# Altium PCB Secondary-Board-v1.0.PcbDoc (part 2 of 3)
Units mm, origin at the board's own origin, x right, y up, seen from the top; angles counter-clockwise.
Board outline 160 x 120 mm, 4 copper layers (Top Layer, GND, PWR, Bottom Layer), stack 1.566 mm thick; 110 components, 60 nets, 340 pads, 181 vias.
Unrouted connection lines stored in the file: 32.
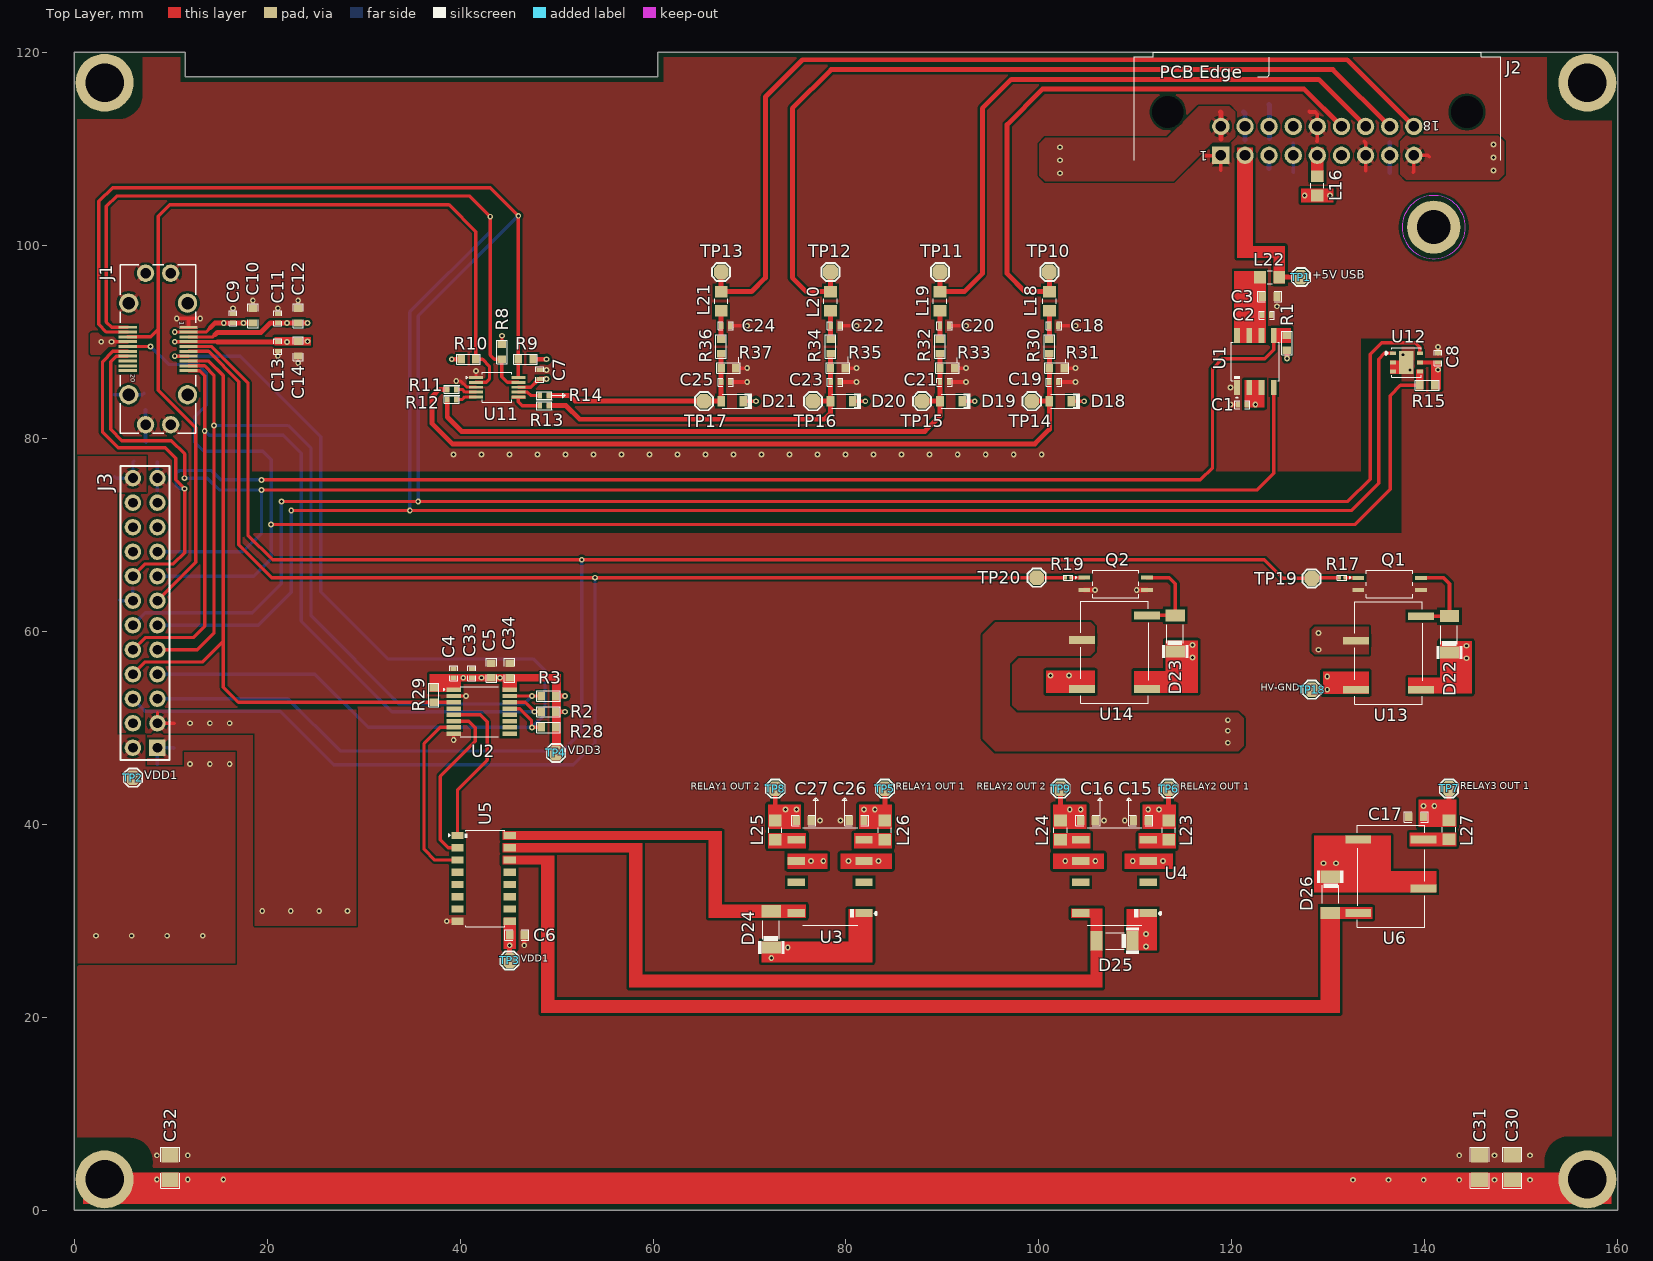
[diagram p0: Top Layer view]

## Via types
v1: diameter 0.6, hole 0.3, Top Layer to Bottom Layer, 181 vias

## Nets (pads, with @x,y where several pads share a name; then routed paths per layer and width w, separated by ;. In a path a pad name is that pad's centre, name@x,y a point inside that pad or via, vN(x,y) a via of type N, cw(c..) or ccw(c..) an arc to the next point about the centre after c; other vN are vias at no path point) (continued)
GND: (continued)
  Top Layer w0.305: C9.1@16.472,92.871 v1(16.472,93.455) ; C10.1@18.529,93.455 v1(18.529,94.268) ; v1(21.12,88.502) C13.1@21.12,89.027 ; C11.1@21.12,92.871 v1(21.12,93.455) ; v1(23.228,87.791) C14.1@23.228,88.502 ; C12.1@23.228,93.455 v1(23.228,94.268) ; v1(39.34,48.717) U2.8@39.34,49.363 ; U2.2@39.34,53.263 v1(40.615,53.263) ; v1(39.611,85.918) 39.614,85.915 40.07,85.915 40.715,85.27 41.638,85.27 U11.3@41.64,85.268 ; U11.1@41.64,86.268 v1(41.64,86.944) ; C7.2@48.26,87.058 v1(48.971,87.058)
  Top Layer w0.381: v1(10.643,92.401) 11.862,92.401 ; J1.1@11.862,91.485 11.862,92.401 ; v1(13.081,92.401) 11.862,92.401 ; C25.1@67.998,85.801 v1(69.759,85.801) ; C24.1@67.998,91.643 v1(69.759,91.643) ; R37.1@68.583,87.249 v1(69.759,87.249) ; C23.1@79.338,85.801 v1(81.098,85.801) ; C22.1@79.338,91.643 v1(81.098,91.643) ; R35.1@79.922,87.249 v1(81.098,87.249) ; C21.1@90.678,85.801 v1(92.438,85.801) ; C20.1@90.678,91.643 v1(92.438,91.643) ; R33.1@91.262,87.249 v1(92.438,87.249) ; C19.1@102.018,85.801 v1(103.778,85.801) ; C18.1@102.018,91.643 v1(103.778,91.643) ; R31.1@102.602,87.249 v1(103.778,87.249) ; 117.246,109.271 118.819,109.271 J2.1@118.848,109.3 118.848,107.774 118.847,107.772 118.847,107.747 ; v1(119.837,83.47) C1.1@120.593,83.47 ; 128.016,113.843 128.067,113.792 128.625,113.792 128.848,113.569 J2.14@128.848,112.3 128.848,110.789 128.803,110.744 ; 133.696,110.749 133.848,110.597 J2.7@133.848,109.3 133.848,107.737
  Top Layer w0.508: v1(38.626,29.921) U5.8@39.743,29.921 ; v1(46.66,27.427) C6.2@46.66,28.499 ; Q2.2@104.701,64.262 v1(105.791,64.262) ; v1(110.121,64.262) Q2.3@111.201,64.262 ; C8.2@141.351,88.773 v1(141.351,89.433)
  Bottom Layer w0.381: 7.412,82.916 J1.SH4@7.412,81.385 7.412,79.644 7.479,79.577 ; 8.636,46.228 J3.1@8.636,47.904 10.287,47.904 10.312,47.879 ; 8.636,74.574 J3.23@8.636,75.844 8.636,77.495
  other v1: 8.578,5.664 11.786,5.664 143.551,5.664 147.198,5.664 150.881,5.664 77.292,40.369 79.426,40.369 106.751,40.369 108.885,40.369 39.319,78.308 42.222,78.308 45.125,78.308 48.028,78.308 50.931,78.308 53.833,78.308 56.736,78.308 59.639,78.308 62.542,78.308 65.445,78.308 68.348,78.308 71.251,78.308 74.153,78.308 77.056,78.308 79.959,78.308 82.862,78.308 85.765,78.308 88.668,78.308 91.571,78.308 94.473,78.308 97.376,78.308 100.279,78.308 119.837,85.233 138.441,87.034 137.707,88.632 124.67,93.65
HV-GND: L16.1 TP18.1 U13.4 U14.4 | length 4.6
  Top Layer w0.33: TP18.1@128.27,53.924 U13.4@132.85,53.924
  other v1: 129.869,53.924 129.869,55.296 101.194,55.397 103.124,55.397 127.533,105.137 130.163,105.137
I2C2_SCL: J1.10 J3.10 R2.1 U2.14 | length 96.4
  Top Layer w0.345: J3.10@6.096,58.064 7.357,59.325 12.347,59.325 13.538,60.516 v1(13.538,80.747) 13.538,86.473 13.027,86.985 J1.10@11.862,86.985 ; U2.14@45.14,52.613 46.752,52.613 v1(47.727,51.638) R2.1@48.412,51.638
  Bottom Layer w0.345: v1(13.538,80.747) 13.998,80.287 21.681,80.287 23.545,78.423 23.545,61.037 32.944,51.638 v1(47.727,51.638)
I2C2_SDA: J1.9 J3.9 R3.1 U2.15 | length 95
  Top Layer w0.345: J3.9@8.636,58.064 12.776,58.064 14.5,59.788 v1(14.5,81.305) 14.5,86.511 13.526,87.485 J1.9@11.862,87.485 ; U2.15@45.14,53.263 v1(47.447,53.263) R3.1@48.412,53.263
  Bottom Layer w0.345: v1(14.5,81.305) 22.179,81.305 24.562,78.923 24.562,61.561 33.685,52.438 46.622,52.438 v1(47.447,53.263)
I2C3_SCL: J1.12 J3.12 R9.1 U11.10 U12.6 | length 271
  Top Layer w0.345: J1.12@5.562,90.985 3.355,90.985 2.565,91.775 2.565,104.527 3.987,105.949 43.124,105.949 v1(46.04,103.032) R9.1@46.04,88.171 U11.10@46.04,86.268 ; v1(21.488,73.431) v1(35.662,73.431) 132.013,73.431 134.315,75.733 134.315,88.671 135.534,89.891 139.017,89.891 139.474,89.433 U12.6@139.474,88.783
  Bottom Layer w0.345: J3.12@6.096,60.604 7.373,61.881 18.477,61.881 21.488,64.892 v1(21.488,73.431) v1@21.488,73.482 ; v1(35.662,73.431) 35.662,92.654 v1(46.04,103.032)
I2C3_SDA: J1.11 J3.11 R8.1 U11.9 U12.1 | length 261.2
  Top Layer w0.345: J1.11@5.562,91.485 3.886,91.485 3.352,92.019 3.352,104.026 4.409,105.083 40.993,105.083 v1(43.129,102.946) 43.129,88.607 43.565,88.171 R8.1@44.34,88.171 44.34,86.346 44.919,85.768 U11.9@46.04,85.768 ; v1(22.504,72.492) v1(34.798,72.492) 132.37,72.492 135.204,75.325 135.204,88.19 135.798,88.783 U12.1@136.674,88.783
  Bottom Layer w0.345: J3.11@8.636,60.604 19.1,60.604 22.504,64.008 v1(22.504,72.492) ; v1(34.798,72.492) 34.798,93.066 43.129,101.397 v1(43.129,102.946)
I2C_ADC_RDY: J1.13 J3.13 R10.1 U11.2 | length 98.9
  Top Layer w0.345: J1.13@5.562,90.485 7.935,90.485 8.712,91.262 ; J3.13@8.636,63.144 12.598,67.106 12.598,81.068 8.712,84.954 8.712,91.262 ; U11.2@41.64,85.768 42.703,85.768 43.053,86.118 43.053,87.445 42.335,88.163 41.646,88.163 R10.1@41.638,88.171 41.638,101.389 38.862,104.165 9.906,104.165 8.712,102.972 8.712,91.262
I2C_ANI0: J2.15 L18.1 TP10.1 | length 60.4
  Top Layer w0.508: TP10.1@101.078,97.206 L18.1@101.078,95.174 98.552,95.174 96.692,97.034 96.692,112.488 100.358,116.154 127.494,116.154 J2.15@131.348,112.3
I2C_ANI0_IC: C19.2 D18.2 R11.2 R30.2 R31.2 TP14.1 | length 79.8
  Top Layer w0.508: R11.2@38.672,85.039 37.835,85.039 37.106,84.31 37.106,81.491 39.192,79.405 99.576,79.405 101.078,80.907 D18.2@101.078,83.82 ; TP14.1@99.249,83.82 D18.2@101.078,83.82 ; R30.2@101.078,88.722 R31.2@101.078,87.249 C19.2@101.078,85.801 D18.2@101.078,83.82
I2C_ANI1: J2.16 L19.1 TP11.1 | length 67.3
  Top Layer w0.508: TP11.1@89.738,97.206 L19.1@89.738,95.174 92.264,95.174 94.133,97.043 94.133,114.165 97.138,117.17 128.978,117.17 J2.16@133.848,112.3
I2C_ANI1_IC: C21.2 D19.2 R12.2 R32.2 R33.2 TP15.1 | length 62.5
  Top Layer w0.508: R12.2@38.672,83.998 38.672,82.182 40.157,80.696 88.177,80.696 89.738,82.257 D19.2@89.738,83.82 ; TP15.1@87.884,83.82 D19.2@89.738,83.82 ; R32.2@89.738,88.722 R33.2@89.738,87.249 C21.2@89.738,85.801 D19.2@89.738,83.82
I2C_ANI2: J2.17 L20.1 TP12.1 | length 90.1
  Top Layer w0.508: TP12.1@78.398,97.206 L20.1@78.398,95.174 75.892,95.174 74.439,96.626 74.439,114.165 78.461,118.186 130.462,118.186 J2.17@136.348,112.3
I2C_ANI2_IC: C23.2 D20.2 R13.2 R34.2 R35.2 TP16.1 | length 38
  Top Layer w0.508: R13.2@49.2,83.363 50.986,83.363 52.399,81.95 77.762,81.95 78.398,82.586 D20.2@78.398,83.82 ; TP16.1@76.581,83.82 D20.2@78.398,83.82 ; R34.2@78.398,88.722 R35.2@78.398,87.249 C23.2@78.398,85.801 D20.2@78.398,83.82
I2C_ANI3: J2.18 L21.1 TP13.1 | length 97.6
  Top Layer w0.508: TP13.1@67.059,97.206 L21.1@67.059,95.174 70.212,95.174 71.645,96.607 71.645,115.35 75.497,119.202 131.946,119.202 J2.18@138.848,112.3
I2C_ANI3_IC: C25.2 D21.2 R14.2 R36.2 R37.2 TP17.1 | length 23
  Top Layer w0.508: R14.2@49.2,84.418 51.33,84.418 51.928,83.82 TP17.1@65.278,83.82 D21.2@67.059,83.82 C25.2@67.059,85.801 R37.2@67.059,87.249 R36.2@67.059,88.722
I2C_THS_INT: J1.15 J3.15 R15.2 U12.4 | length 179.2
  Top Layer w0.345: J1.15@5.562,89.485 v1(7.935,89.485) ; v1(20.422,71.044) 132.771,71.044 136.403,74.675 136.403,84.408 137.465,85.471 R15.2@139.474,85.471
  Bottom Layer w0.345: v1(7.935,89.485) 9.79,87.63 12.848,87.63 13.724,86.755 13.724,83.415 12.524,82.216 12.524,79.577 13.459,78.642 19.544,78.642 20.422,77.764 v1(20.422,71.044) 20.422,67.467 18.638,65.684 J3.15@8.636,65.684
IOEXP_INT: J1.7 J3.7 R28.1 U2.13 | length 114.7
  Top Layer w0.345: v1(10.439,88.485) J1.7@11.862,88.485 ; U2.13@45.14,51.963 46.2,51.963 47.399,50.765 47.399,50.062 v1(47.447,50.013) R28.1@48.412,50.013
  Bottom Layer w0.345: J3.7@8.636,55.524 24.969,55.524 30.479,50.013 v1(47.447,50.013) 48.806,51.372 48.806,55.863 47.563,57.106 32.53,57.106 25.578,64.059 25.578,80.137 17.23,88.485 v1(10.439,88.485)
IOEXP_RESET: J1.8 J3.8 R29.1 U2.3 | length 71.9
  Top Layer w0.345: J3.8@6.096,55.524 7.367,56.795 13.324,56.795 15.476,58.947 ; J1.8@11.862,87.985 13.975,87.985 15.476,86.484 15.476,58.947 ; U2.3@39.34,52.613 R29.1@37.286,52.613 17.034,52.613 15.476,54.171 15.476,58.947
ISO_RELAY1_IN1: J2.3 U13.2 | length 1.3
  Bottom Layer w0.508: 123.848,107.955 J2.3@123.848,109.3
  other v1: 128.956,58.064 128.956,59.792
ISO_RELAY2_IN1: J2.4 U14.2 | length 3
  Bottom Layer w0.345: 126.348,107.521 J2.4@126.348,109.3 126.348,110.553
  other v1: 119.569,48.426 119.569,49.67 119.569,50.762
NetC2_2: C2.2 C3.2 L22.1 U1.6 U1.7 U1.8
NetC18_2: C18.2 L18.2 R30.1 | length 2.9
  Top Layer w0.508: R30.1@101.078,90.246 C18.2@101.078,91.643 L18.2@101.078,93.174
NetC20_2: C20.2 L19.2 R32.1 | length 2.9
  Top Layer w0.508: R32.1@89.738,90.246 C20.2@89.738,91.643 L19.2@89.738,93.174
NetC22_2: C22.2 L20.2 R34.1 | length 2.9
  Top Layer w0.508: R34.1@78.398,90.246 C22.2@78.398,91.643 L20.2@78.398,93.174
NetC24_2: C24.2 L21.2 R36.1 | length 2.9
  Top Layer w0.508: R36.1@67.059,90.246 C24.2@67.059,91.643 L21.2@67.059,93.174
NetD22_2: D22.2 Q1.4 U13.8 | length 9.5
  Top Layer w0.381: U13.8@139.59,61.544 D22.2@142.545,61.544 142.545,64.897 141.935,65.507 Q1.4@139.59,65.507
NetD23_2: D23.2 Q2.4 U14.8 | length 9.4
  Top Layer w0.381: U14.8@111.201,61.62 D23.2@114.122,61.62 114.122,64.898 113.488,65.532 Q2.4@111.201,65.532
NetJ2_5: J2.5 L16.2
NetL23_1: L23.1 U4.4
NetL24_1: L24.1 U4.5
NetL25_1: L25.1 U3.5
NetL26_1: L26.1 U3.4
NetL27_1: L27.1 U6.4
NetQ1_1: Q1.1 R17.2 | length 1.4
  Top Layer w0.345: R17.2@131.692,65.507 Q1.1@133.09,65.507
NetQ2_1: Q2.1 R19.2 | length 1.4
  Top Layer w0.33: R19.2@103.303,65.532 Q2.1@104.701,65.532
NetR11_1: R11.1 U11.4 | length 2.1
  Top Layer w0.33: R11.1@39.611,85.039 40.232,85.039 40.503,84.768 U11.4@41.64,84.768